# Altium PCB Bracelet_Main.PcbDoc (part 1 of 3)
Units mil, origin at the board's own origin, x right, y up, seen from the top; angles counter-clockwise.
Board outline 865.94 x 2303.17 mil, 4 copper layers (Top Layer, POWER, GND, Bottom Layer), stack 7.834 mil thick; 115 components, 70 nets, 405 pads, 108 vias.
Unrouted connection lines stored in the file: 2.
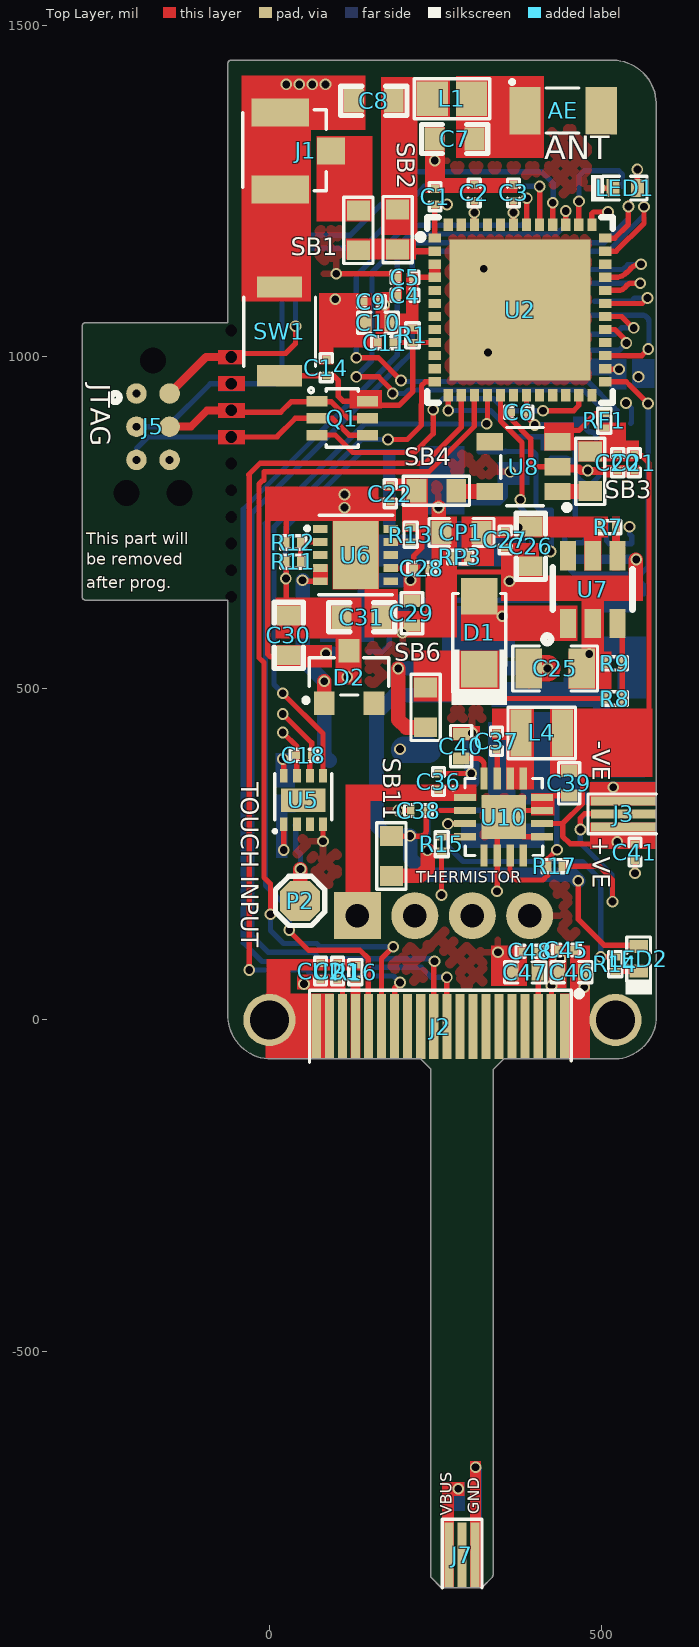
[diagram p0: Top Layer view]
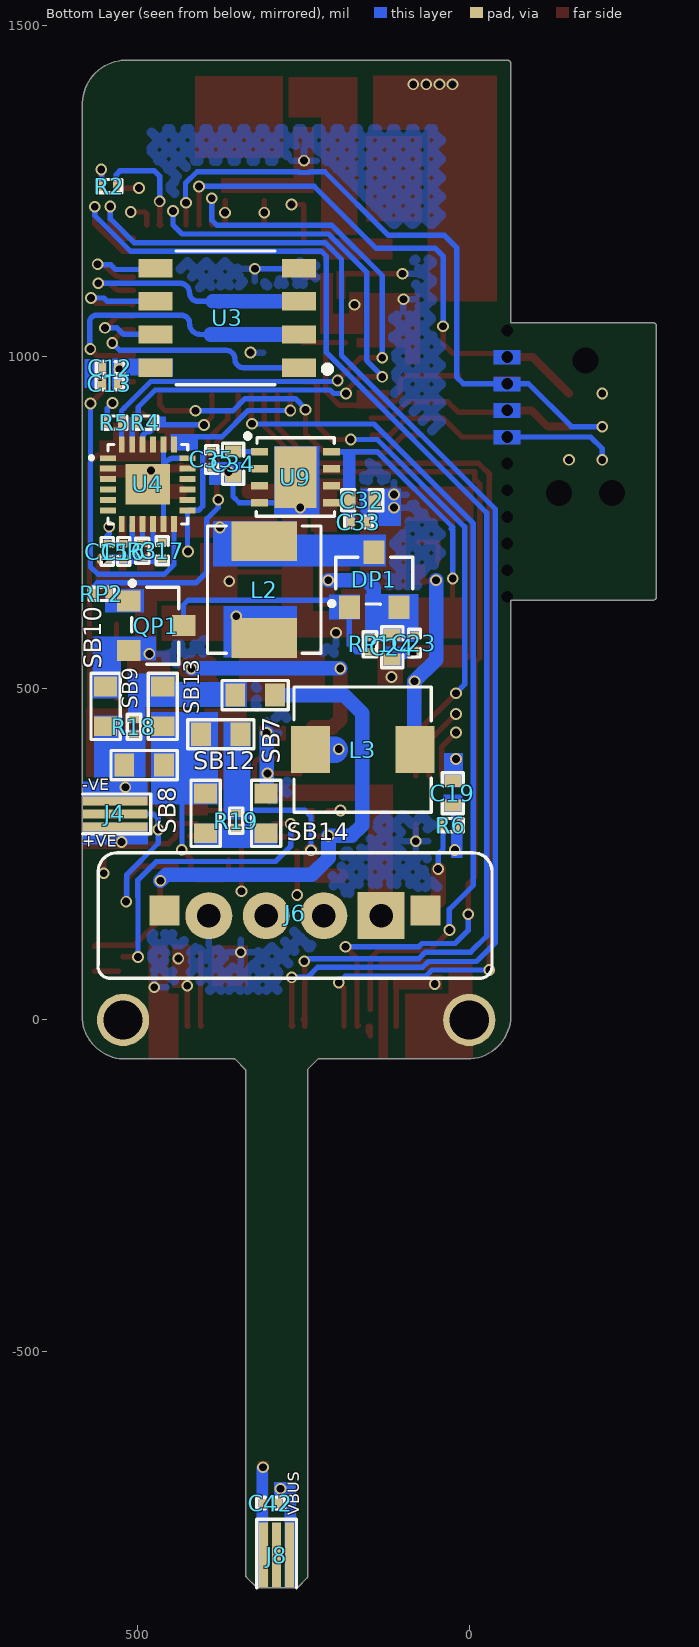
[diagram p1: Bottom Layer view, seen from below]
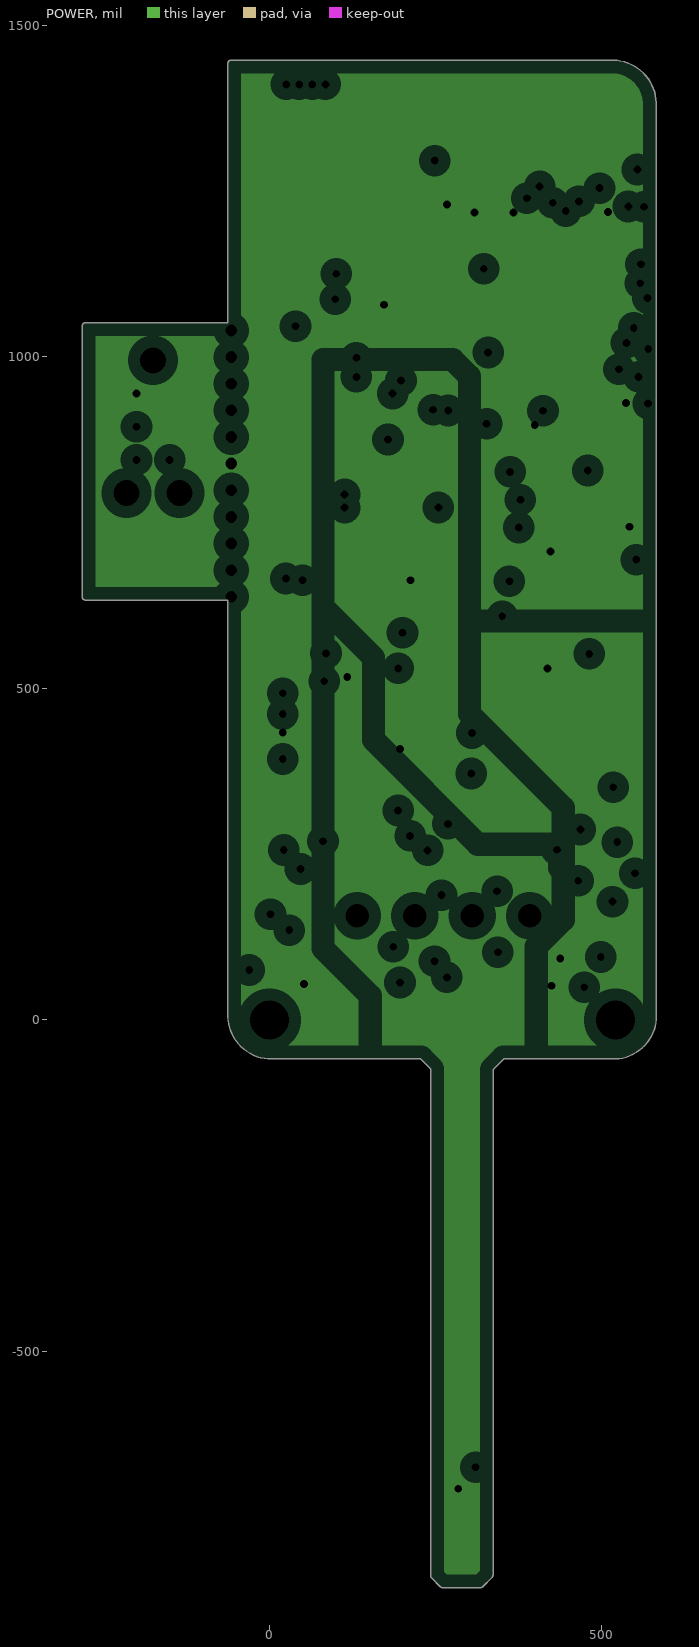
[diagram p2: POWER, clearances drawn from the general rule]
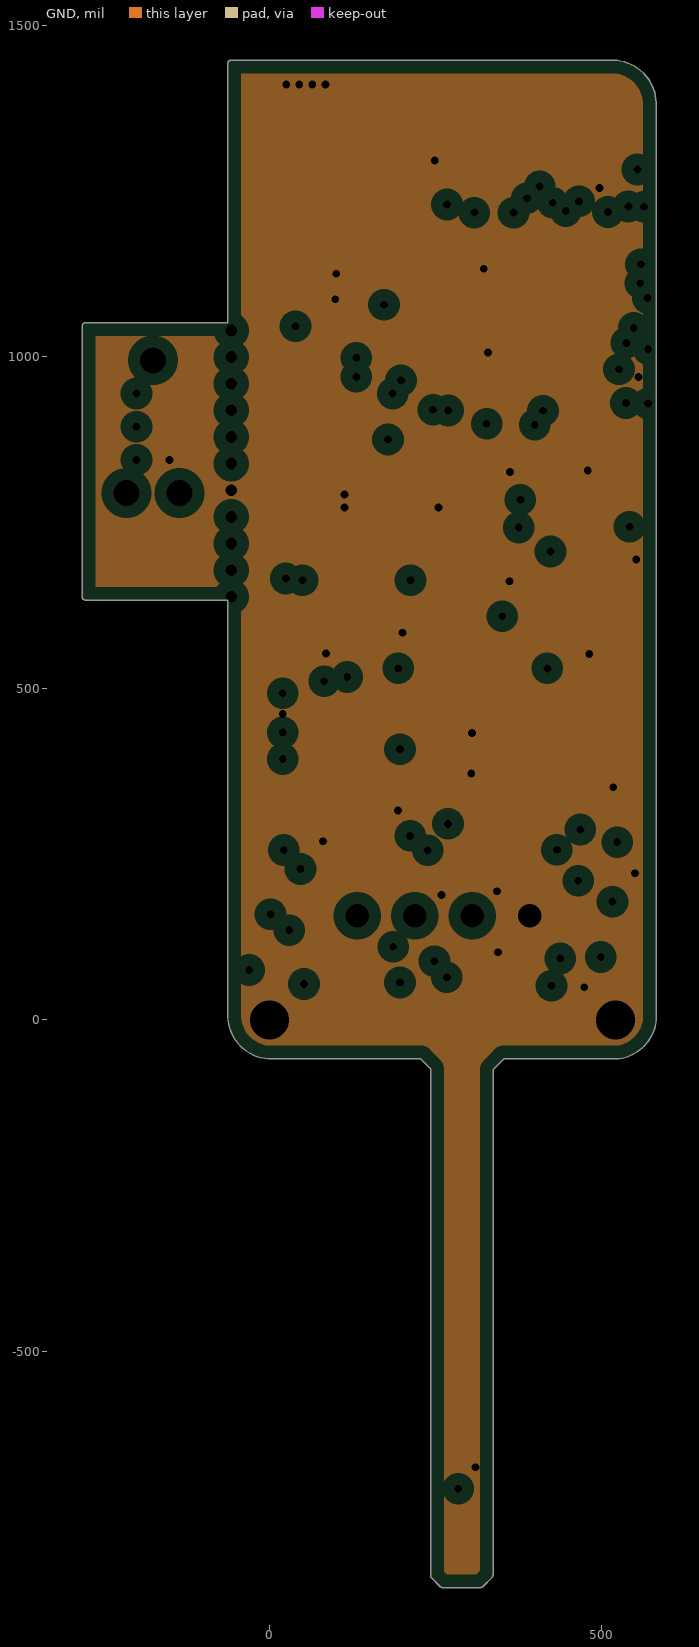
[diagram p3: GND, clearances drawn from the general rule]
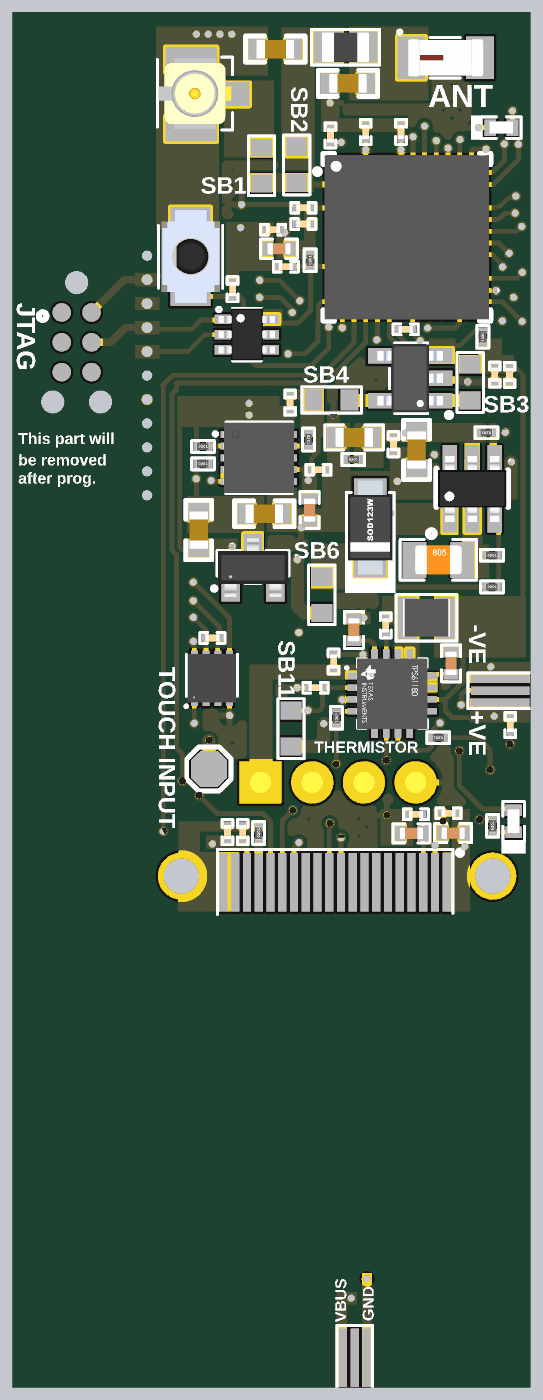
[diagram p5: 3D render of the assembled board from above, using the file's embedded part models]
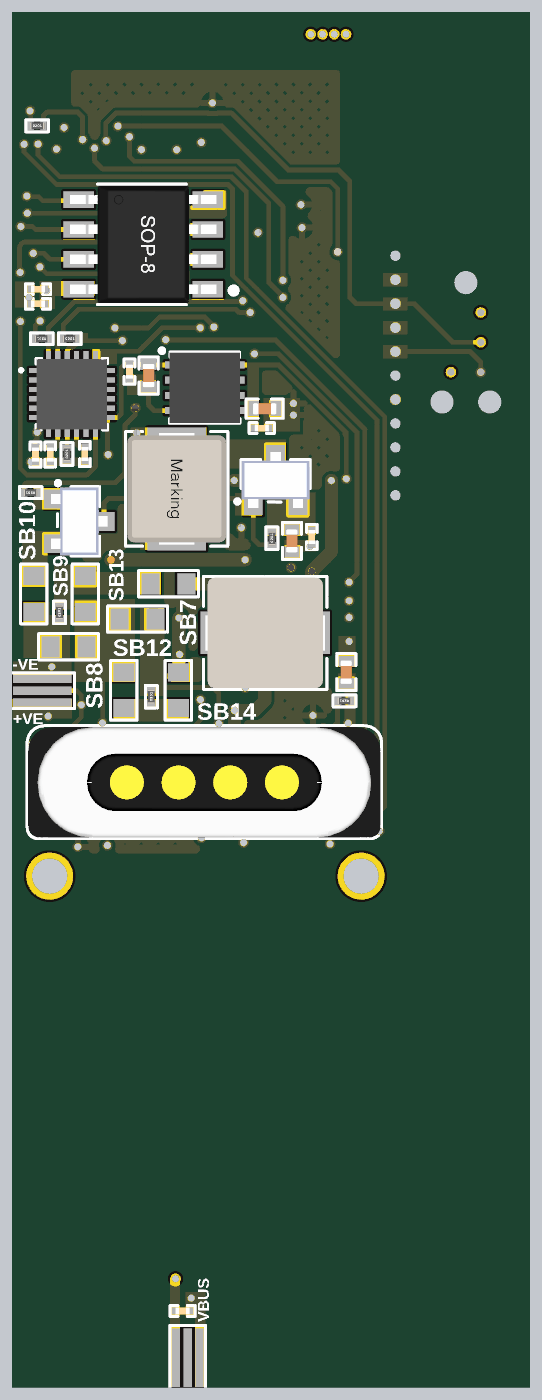
[diagram p6: 3D render of the assembled board from below, using the file's embedded part models]

## Layer stack, top to bottom
Fllex1 Top Coverlay 1: solder mask 1.968, Polyimide, Dk 3.5
Top Layer: signal copper 2.165
Dielectric 1: core 0.591, Polyimide, Dk 4.2
POWER: plane copper 0.669, net (Multiple Nets)
Dielectric 2: prepreg 0.984, Dk 4.2
GND: plane copper 0.669, net GND
Dielectric 3: core 0.591, Polyimide, Dk 4.2
Bottom Layer: signal copper 2.165
Fllex1 Bottom Coverlay 1: solder mask 1.968, Polyimide, Dk 3.5

## Board outline
-282.34,1046.3 cw(c-277.32,1046.3) -277.32,1051.31 -62.65,1051.31 -62.65,1442.14 cw(c-57.63,1442.14) -57.63,1447.15 522.25,1447.15 cw(c522.25,1442.14) 524.23,1446.75 cw(c517.01,1380.88) 583.25,1382.61 cw(c578.25,1382.18) 583.27,1382.18 583.27,3.45 cw(c578.6,1.62) 583.59,1.19 cw(c517.58,6.85) 527.36,-58.68 cw(c526.48,-53.74) 526.48,-58.76 353.47,-58.76 cw(c349.74,-55.4) 353.29,-58.95 337.17,-75.06 337.17,-836.98 cw(c332.16,-836.98) 335.69,-840.55 335.7,-840.53 321.69,-854.54 321.71,-854.53 cw(c318.14,-851) 318.14,-856.01 261.17,-856.01 cw(c261.17,-851) 257.61,-854.53 257.63,-854.54 244.61,-841.53 244.63,-841.55 cw(c248.16,-837.98) 243.14,-837.98 243.14,-74.06 228.03,-58.95 cw(c231.57,-55.4) 227.85,-58.76 -0.92,-58.76 cw(c-1.88,-53.83) -1.88,-58.85 cw(c-1.88,-53.83) -2.3,-58.83 cw(c3.36,7.19) -62.87,5.22 cw(c-57.86,5.37) -62.65,6.86 -62.65,633.02 -277.32,633.02 cw(c-277.32,638.03) -282.34,638.03

## Design rules (kind name [scope] priority, off if disabled: settings)
Clearance [All] p1: gap=5 ignorepadtopadclearanceinfootprint=FALSE except(0: Arc-Hole Track-Hole SMDPad-Hole THPad-Hole Via-Hole Fill-Hole Poly-Hole Region-Hole Text-Hole; 3: Arc-SMDPad Track-SMDPad SMDPad-SMDPad)
HoleToHoleClearance [All] p1: gap=0 allowstackedmicrovias=TRUE
MinimumSolderMaskSliver [All] p1: minsoldermaskwidth=0
PlaneClearance [All] p1: clearance=18
PlaneConnect [All] p1: planeconnectstyle=Direct reliefexpansion=20 reliefentries=4 reliefconductorwidth=10 reliefairgap=10
PolygonConnect [All] p1: thpad.connectstyle=Relief thpad.reliefconductorwidth=10 thpad.reliefentries=4 thpad.polygonreliefangle="90 Angle" thpad.airgapwidth=10 smdpad.connectstyle=Direct smdpad.reliefconductorwidth=10 smdpad.reliefentries=4 smdpad.polygonreliefangle="90 Angle" smdpad.airgapwidth=10 via.connectstyle=Relief via.reliefconductorwidth=10 via.reliefentries=4 via.polygonreliefangle="90 Angle" via.airgapwidth=10
RoutingVias [All] p1: holewidth=11.81 width=17.72 viastyle="Through Hole" minholewidth=11.81 minwidth=17.72 maxholewidth=11.81 maxwidth=17.72
SilkToSilkClearance [All] p1: silktosilkclearance=0
SilkToSolderMaskClearance [IsPad] p1: minsilkscreentomaskgap=0 clearancetoexposedcopper=TRUE
SolderMaskExpansion [All] p1: expansion=4
Width [All] p1: maxlimit=40 minlimit=8 preferedwidth=22
24 further rules are at their usual default settings.

## Classes and differential pairs
component class U_Peripheral_Section: C15 C16 C17 C18 C19 P2 R3 R4 R5 R6 U4 U5
component class U_MCU_Power_Sec: C32 C33 C34 C35 U9
component class U_LED_Power_Sec: C20 C21 C22 C23 C24 C25 C26 C27 CP1 D1 DP1 L2 R7 R8 R9 RF1 RP1 RP2 RP3 SB3 SB4 SB6 U7 U8
component class U_Fast_Charger_Sec: C28 C29 C30 C31 D2 L3 R11 R12 R13 U6
component class U_Controller_Section: AE C1 C2 C3 C4 C5 C6 C7 C8 C9 C10 C11 C12 C13 C14 J1 L1 LED1 Q1 R1 R2 SB1 SB2 SW1 U3
component class U_Connector_Section: C41 C42 C45 C46 C47 C48 CU1 CU2 J2 J3 J4 J5 J7 J8 R16
component class U_Battery_Charging_Section: C36 C37 C38 C39 C40 J6 L4 LED2 R14 R15 R17 R18 R19 SB7 SB8 SB9 SB10 SB11 SB12 SB13 SB14 U10

## Components (designator, comment, footprint, x,y, rotation, side; value= is the part's Value field where it differs from the comment)
AE "2450AT18A100E" 2450AT18A100E 442.91,1371.26 r0 top
C1 "0.1uF" "CAP 0201" 249.76,1241.26 r90 top
C2 "0.1uF" "CAP 0201" 308.76,1247.07 r90 top
C3 "0.1uF" "CAP 0201" 368.06,1247.07 r90 top
C4 "0.1uF" "CAP 0201" 204.47,1092.56 r180 top
C5 "0.1uF" "CAP 0201" 204.47,1119.77 r180 top
C6 "0.1uF" "CAP 0201" 375.94,916.19 r180 top
C7 "2pF" Cap0603 279.13,1328.35 r180 top
C8 "2.7pF" Cap0603 157.48,1385.83 r180 top
C9 "0.1uF" "CAP 0201" 153.76,1083.26 r180 top
C10 "10uF" "Cap 0402" 163.76,1051.26 r180 top
C11 "1uF" "CAP 0201" 174.95,1021.26 r180 top
C12 "1uF" "CAP 0201" 541.57,983.56 r0 bottom
C13 "0.1uF" "CAP 0201" 541.73,959.06 r0 bottom
C14 "0.1uF" "CAP 0201" 85.83,983.46 r90 top
C15 "0.1uF" "CAP 0201" 545.67,706.3 r270 bottom
C16 "0.1uF" "CAP 0201" 520.87,706.3 r270 bottom
C17 "0.1uF" "CAP 0201" 462.99,707.48 r90 bottom
C18 "0.1uF" "CAP 0201" 51.97,399.21 r0 top
C19 "10nF" "Cap 0402" 24.8,341.73 r90 bottom
C20 "1uF" "CAP 0201" 525.25,840.25 r270 top
C21 "0.1uF" "CAP 0201" 550.01,840.06 r270 top
C22 "0.1uF" "CAP 0201" 182.28,793.31 r270 top
C23 "0.1uF" "CAP 0201" 82.68,568.11 r270 bottom
C24 "10uF" "Cap 0402" 115.9,561.81 r270 bottom
C25 "22uF" Cap0805 430.71,529.92 r0 top
C26 "22uF" Cap0603 394.09,714.09 r270 top
C27 "0.1uF" "CAP 0201" 355.46,723.73 r270 top
C28 "1uF" "CAP 0201" 229.56,680.91 r0 top
C29 "10uF" "Cap 0402" 214.96,613.31 r270 top
C30 "22uF" Cap0603 29.13,579.92 r270 top
C31 "22uF" Cap0603 138.96,607.2 r0 top
C32 "4.7uF" "Cap 0402" 161.6,783.25 r180 bottom locked
C33 "0.1uF" "CAP 0201" 166.54,750.79 r180 bottom
C34 "4.7uF" "Cap 0402" 356.1,838.75 r270 bottom locked
C35 "0.1uF" "CAP 0201" 388.19,845.28 r270 bottom
C36 "2.2uF" "CAP 0201" 255.07,359.43 r90 top
C37 "47nF" "CAP 0201" 342.42,420.32 r270 top
C38 "2.2uF" "CAP 0201" 224.8,315.75 r180 top
C39 "10uF" "Cap 0402" 451.97,356.69 r270 top
C40 "10uF" "Cap 0402" 289.07,412.83 r270 top
C41 "0.1uF" "CAP 0201" 551.18,253.15 r270 top
C42 "0.1uF" "CAP 0201" 299.16,-728.57 r0 bottom
C45 "0.1uF" "CAP 0201" 447.64,105.51 r0 top
C46 "4.7uF" "Cap 0402" 455.51,72.05 r0 top
C47 "4.7uF" "Cap 0402" 385.43,71.65 r180 top
C48 "0.1uF" "CAP 0201" 392.91,103.54 r180 top
CP1 "10uF" Cap0603 289.54,735.04 r0 top
CU1 "0.1uF" "CAP 0201" 102.76,73.62 r90 top
CU2 "1uF" "CAP 0201" 77.17,73.62 r90 top
D1 "PMEG3010ER,115" SOD123W 316.54,583.86 r270 top
D2 "PMEG2010ET,215" PMEG2010ET,215 120.08,516.93 r0 top
DP1 "SSM3J334R,LF" SOT-23F 143.31,663.78 r180 bottom
J1 "U.FL-R-SMT-1(80)" U.FL-R-SMT-1(80) 56.69,1310.24 r90 top
J2 "20 Pin FPC" "20 Pin FPC" 257.68,-10.02 r180 top
J3 "3 Pin FPC" "3 Pin FPC" 534.25,310.63 r90 top
J4 "3 Pin FPC" "3 Pin FPC" 534.25,310.63 r270 bottom
J5 "TC2030-IDC" TC2030-IDC -175.51,894.5 r270 top
J6 "HTP-CON-M411H" HTP-CON-M411H 262.6,161.02 r0 bottom locked value=Custom
J7 "3 Pin FPC" "3 Pin FPC" 290.55,-807.09 r0 top
J8 "3 Pin FPC" "3 Pin FPC" 290.55,-807.09 r180 bottom
L1 "2.7nH" L-15W2N7SV4E 275.2,1388.98 r180 top
L2 "MS0420-100M" MS0420-100M 309.01,648.82 r270 bottom value=10uH
L3 "4.7uH" AMDLA4530Q-4R7MT 160.74,407.6 r0 bottom
L4 "1uH" "IND  0806" 410.63,432.68 r0 top
LED1 "16-213/GHC-YR1S1/3T" "LED 0402" 536.26,1254.26 r180 top
LED2 "16-213/GHC-YR1S1/3T" "LED 0402" 556.69,92.13 r270 top
P2 "Test Point" "TEST POINT" 46.26,179.53 r270 top
Q1 "UMH3NTN" SOT-363 109.84,907.48 r0 top
QP1 "MMBT3904-TP" SOT-23F 472.05,594.49 r270 bottom
R1 "10K" Res-0201 215.76,1032.17 r90 top
R2 "1.2K" Res-0201 542.94,1257.26 r180 bottom locked
R3 "10K" Res-0201 492.91,707.28 r90 bottom
R4 "10K" Res-0201 488.25,900.5 r180 bottom locked
R5 "10K" Res-0201 535.08,900.5 r0 bottom locked
R6 "10K" Res-0201 27.8,293.7 r0 bottom
R7 "47K" Res-0201 511.22,742.91 r180 top
R8 "1.4M" Res-0201 520.46,484.65 r0 top
R9 "71.5K" Res-0201 520.46,537.73 r0 top
R11 "95.3K" Res-0201 36.14,690.91 r0 top
R12 "13K" Res-0201 36.14,719.91 r0 top
R13 "1M" Res-0201 212.96,731.73 r270 top
R14 "1K" Res-0201 521.65,84.25 r90 top
R15 "13.3K" Res-0201 259.84,265.16 r270 top
R16 "1M" Res-0201 129.53,72.24 r90 top
R17 "10K" Res-0201 430.51,231.89 r180 top
R18 "21K" Res-0201 505.51,441.93 r90 bottom
R19 "4.32K" Res-0201 351.57,300.59 r90 bottom
RF1 "47K" Res-0201 505.12,903.54 r270 top
RP1 "10K" Res-0201 149.61,566.11 r90 bottom
RP2 "10K" Res-0201 553.74,642.52 r0 bottom
RP3 "10K" Res-0201 287.89,698.03 r0 top
SB1 "Solder Bridge" "Solder Bridge" 134.25,1190.55 r90 top
SB2 "Solder Bridge" "Solder Bridge" 193.31,1191.73 r90 top
SB3 "Solder Bridge" "Solder Bridge" 483.86,827.24 r270 top
SB4 "Solder Bridge" "Solder Bridge" 251.76,797.95 r180 top
SB6 "Solder Bridge" "Solder Bridge" 235.43,471.26 r270 top
SB7 "Solder Bridge" "Solder Bridge" 322.83,489.76 r0 bottom
SB8 "Solder Bridge" "Solder Bridge" 490.2,384.25 r180 bottom
SB9 "Solder Bridge" "Solder Bridge" 462.2,472.83 r90 bottom
SB10 "Solder Bridge" "Solder Bridge" 548.43,472.83 r90 bottom
SB11 "Solder Bridge" "Solder Bridge" 183.86,247.24 r270 top
SB12 "Solder Bridge" "Solder Bridge" 397.64,311.42 r90 bottom
SB13 "Solder Bridge" "Solder Bridge" 374.59,430.71 r180 bottom
SB14 "Solder Bridge" "Solder Bridge" 306.3,311.42 r90 bottom
SW1 "B3U-1000P" B3U-1000P 15.35,1038.19 r90 top
U2 "ESP32-PICO-D4" "48-SMD Module" 377.9,1070.56 r0 top
U3 "LY68L6400SLIT" SOP-8 364.99,1058.56 r0 bottom value=Custom
U4 "ICM-20649" "24-QFN (3x3)" 484.63,807.67 r180 bottom locked
U5 "AT42QT1011-MAHR" 8-UDFN 51.18,331.59 r90 top
U6 "SY7304DBC" DFN-10 129.96,700.91 r0 top
U7 "AX5523CA" SOT-23-6 487.4,648.82 r90 top
U8 "MIC2004-0.5YM5-TR" SOT-23-5 383.43,834.25 r180 top
U9 "AP7361C-33FGE-7" U-DFN3030-8 262.1,818.25 r180 bottom locked
U10 "BQ25303JRTER" "16-WQFN (3x3)" 353.15,305.91 r0 top

## Footprints (in the part's own frame and the unit in brackets; to place one, negate y for a bottom-side part, rotate by r counter-clockwise, add the part's x,y. Pads: shape width x height; smd on the part's side, far side on the other; paste and mask are expansions set on the pad)
"3 Pin FPC" [mm]
  rect 0.35x2.5 smd: 1(-0.5,0) 2(0,0) 3(0.5,0)
  silkscreen extent -0.76,-1.24 0.76,1.37
8-UDFN [mm]
  rect 0.505x0.3 smd: 1(-0.928,0.75) 2(-0.928,0.25) 3(-0.928,-0.25) 4(-0.928,-0.75) 5(0.928,-0.75) 6(0.928,-0.25) 7(0.928,0.25) 8(0.928,0.75)
  rect 0.9x1.7 smd: 9(0,0)
  silkscreen extent -1.21,-1.09 1.01,1.11, body extent -1.03,-1.03 1.03,1.03, height 0.61
"16-WQFN (3x3)" [mm] "Charger IC Lithium Ion/Polymer 16-WQFN (3x3)"
  rect 0.85x0.28 smd: 1(-1.475,0.75) 2(-1.475,0.25) 3(-1.475,-0.25) 4(-1.475,-0.75) 9(1.475,-0.75) 10(1.475,-0.25) 11(1.475,0.25) 12(1.475,0.75)
  rect 0.28x0.85 smd: 5(-0.75,-1.475) 6(-0.25,-1.475) 7(0.25,-1.475) 8(0.75,-1.475) 13(0.75,1.475) 14(0.25,1.475) 15(-0.25,1.475) 16(-0.75,1.475)
  rect 1.7x1.7 smd: 17(0,0)
  silkscreen extent -1.98,-1.48 1.5,1.48, body extent -1.51,-1.51 1.51,1.51, height 0.8
"20 Pin FPC" [mm]
  rect 0.35x2.5 smd: 1(-4.75,0) 2(-4.25,0) 3(-3.75,0) 4(-3.25,0) 5(-2.75,0) 6(-2.25,0) 7(-1.75,0) 8(-1.25,0) 9(-0.75,0) 10(-0.25,0) 11(0.25,0) 12(0.75,0) 13(1.25,0) 14(1.75,0) 15(2.25,0) 16(2.75,0) 17(3.25,0) 18(3.75,0) 19(4.25,0) 20(4.75,0)
  silkscreen extent -5.01,-1.4 5.01,1.37
"24-QFN (3x3)" [mm]
  rect 0.62x0.22 smd: 1(-1.52,1) 2(-1.52,0.6) 3(-1.52,0.2) 4(-1.52,-0.2) 5(-1.52,-0.6) 6(-1.52,-1) 13(1.52,-1) 14(1.52,-0.6) 15(1.52,-0.2) 16(1.52,0.2) 17(1.52,0.6) 18(1.52,1)
  rect 0.22x0.62 smd: 7(-1,-1.52) 8(-0.6,-1.52) 9(-0.2,-1.52) 10(0.2,-1.52) 11(0.6,-1.52) 12(1,-1.52) 19(1,1.52) 20(0.6,1.52) 21(0.2,1.52) 22(-0.2,1.52) 23(-0.6,1.52) 24(-1,1.52)
  rect 1.7x1.54 smd: 25(0,0)
  silkscreen extent -2.23,-1.52 1.52,1.52, body extent -1.5,-1.5 1.5,1.5, height 1.03
"48-SMD Module" [mm]
  rect 0.47x0.35 smd: 1(-3.265,2.75) 2(-3.265,2.25) 3(-3.265,1.75) 4(-3.265,1.25) 5(-3.265,0.75) 6(-3.265,0.25) 7(-3.265,-0.25) 8(-3.265,-0.75) 9(-3.265,-1.25) 10(-3.265,-1.75) 11(-3.265,-2.25) 12(-3.265,-2.75) 25(3.265,-2.75) 26(3.265,-2.25) 27(3.265,-1.75) 28(3.265,-1.25) 29(3.265,-0.75) 30(3.265,-0.25) 31(3.265,0.25) 32(3.265,0.75) 33(3.265,1.25) 34(3.265,1.75) 35(3.265,2.25) 36(3.265,2.75)
  rect 0.35x0.47 smd: 13(-2.75,-3.265) 14(-2.25,-3.265) 15(-1.75,-3.265) 16(-1.25,-3.265) 17(-0.75,-3.265) 18(-0.25,-3.265) 19(0.25,-3.265) 20(0.75,-3.265) 21(1.25,-3.265) 22(1.75,-3.265) 23(2.25,-3.265) 24(2.75,-3.265) 37(2.75,3.265) 38(2.25,3.265) 39(1.75,3.265) 40(1.25,3.265) 41(0.75,3.265) 42(0.25,3.265) 43(-0.25,3.265) 44(-0.75,3.265) 45(-1.25,3.265) 46(-1.75,3.265) 47(-2.25,3.265) 48(-2.75,3.265)
  rect 5.4x5.4 smd paste-4: 49(0,0)
  silkscreen extent -3.91,-3.55 3.55,3.55, body extent -3.5,-3.5 3.5,3.5, height 1.04
2450AT18A100E [mm] "RF ANT 2.4GHZ CHIP SOLDER SMD"
  rect 1.2x1.82 smd: 1(-1.46,0) 2(1.46,0)
  silkscreen extent -2.01,-0.86 0.61,1.14, body extent -1.6,-0.8 1.6,0.8, height 1.3
AMDLA4530Q-4R7MT [mm]
  rect 1.5x1.8 smd: 1(-2,0) 2(2,0)
  silkscreen extent -2.63,-2.4 2.63,2.4, body extent -2.55,-2.35 2.55,2.35, height 2.92
B3U-1000P [mm] "SWITCH TACTILE SPST-NO 0.05A 12V"
  rect 0.82x1.72 smd: 1(-1.7,0) 2(1.7,0)
  silkscreen extent -1.35,-1.37 1.32,1.37, body extent -2,-1.26 2,1.24, height 1.6
Cap0603 [mil]
  rect 30x35 smd mask+2.36: 1(-30,0) 2(30,0)
  silkscreen extent -50,-22 50,22, body extent -32,-16 31,16, height 34
Cap0805 [mil] "SMD 0805"
  rect 40x60 smd mask+2.76: 1(-40,0) 2(40,0)
  silkscreen extent -64,-34 64,34, body extent -39,-25 39,25, height 30
"CAP 0201" [mm]
  rect 0.3x0.3 smd mask+0.055: 1(-0.3,0) 2(0.3,0)
  silkscreen extent -0.53,-0.23 0.53,0.23, body extent -0.3,-0.15 0.3,0.15, height 0.28
"Cap 0402" [mil]
  rect 18x25 smd mask+2.36: 1(-18.5,0) 2(18.5,0)
  silkscreen extent -31,-16 31,16, body extent -20,-10 20,10, height 19
DFN-10 [mm] "33V 4A DFN-10 DC-DC Converters RoHS"
  rect 0.55x0.3 smd: 1(-1.35,1) 2(-1.35,0.5) 3(-1.35,0) 4(-1.35,-0.5) 5(-1.35,-1) 6(1.35,-1) 7(1.35,-0.5) 8(1.35,0) 9(1.35,0.5) 10(1.35,1)
  rect 1.75x2.6 smd: 11(0,0)
  silkscreen extent -1.88,-1.52 1.42,1.52, body extent -1.5,-1.5 1.5,1.5, height 0.8
HTP-CON-M411H [mm]
  rect 1.8x1.8 hole 0.9: 1(-3.3,0.1)
  round 1.8 hole 0.9: 2(-1.1,0.1) 3(1.1,0.1) 4(3.3,0.1)
  rect 1.15x1.15 smd: MP1(-5,-0.1) MP2(5,-0.1)
  silkscreen extent -7.55,-2.31 7.55,2.49, body extent -7.5,-2.25 7.5,2.45, height 6.74
"IND  0806" [mm] "1uH ±20% 3.6A 0806 Inductors (SMD) RoHS"
  rect 0.8x1.8 smd: 1(-0.8,0) 2(0.8,0)
  silkscreen extent -1.3,-0.99 1.3,0.99, body extent -1,-0.8 1,0.8, height 1
L-15W2N7SV4E [mm] "FIXED IND 2.7NH 800MA 80MOHM SMD"
  rect 1.2x1.32 smd: 1(-0.75,0) 2(0.75,0)
  silkscreen extent -1.45,-0.76 1.45,0.76, body extent -1,-0.62 1,0.63, height 0.47
"LED 0402" [mm] "Green 520~535nm 0402 Light Emitting Diodes (LED) RoHS"
  rect 0.5x0.7 smd: 1(-0.47,0) 2(0.47,0)
  silkscreen extent -0.84,-0.51 1.3,0.51, body extent -0.5,-0.25 0.5,0.25, height 0.5
MS0420-100M [mm]
  rect 1.52x2.5 smd: 1(-1.85,0) 2(1.85,0)
  silkscreen extent -2.44,-2.17 2.44,2.17, body extent -2.37,-2.1 2.38,2.1, height 1.98
PMEG2010ET,215 [mm]
  rect 0.8x0.9 smd: 1(-0.95,-1) 2(0.95,-1) 3(0,1)
  silkscreen extent -1.7,-0.94 1.52,0.74, body extent -1.5,-1.25 1.5,1.25, height 1.09
Res-0201 [mm]
  rect 0.27x0.37 smd: 1(-0.275,0) 2(0.275,0)
  silkscreen extent -0.48,-0.25 0.48,0.25, body extent -0.3,-0.15 0.3,0.15, height 0.29
SOD123W [mm] "DIODE SCHOTTKY 30V 1A SOD123W"
  rect 1.4x1.4 smd: A(-1.4,0) K(1.4,0)
  silkscreen extent -1.5,-1.07 2.77,1.07, body extent -2,-0.95 2,0.95, height 1.1
"Solder Bridge" [mil] "Solder Bridge ON"
  rect 30x35 smd: 1(-30,0) 2(30,0)
  silkscreen extent -50,-22 50,22
SOP-8 [mm]
  rect 1.3x0.7 smd: 1(-2.75,1.905) 2(-2.75,0.635) 3(-2.75,-0.635) 4(-2.75,-1.905) 5(2.75,-1.905) 6(2.75,-0.635) 7(2.75,0.635) 8(2.75,1.905)
  silkscreen extent -3.97,-2.57 1.96,2.57, body extent -3.11,-2.5 3.11,2.5, height 1.87
SOT-23-5 [mm]
  rect 1x0.66 smd: 1(-1.3,0.95) 2(-1.3,0) 3(-1.3,-0.95) 4(1.3,-0.95) 5(1.3,0.95)
  silkscreen extent -1.74,-1.5 0.88,1.65, body extent -1.4,-1.45 1.4,1.45, height 1.45
SOT-23-6 [mm] "IC BAT CHG LI-ION 1 CELL SOT23-6"
  rect 1.12x0.62 smd: 1(-1.3,0.95) 2(-1.3,0) 3(-1.3,-0.95) 4(1.3,-0.95) 5(1.3,0) 6(1.3,0.95)
  silkscreen extent -2.04,-1.52 0.86,1.88, body extent -1.4,-1.45 1.4,1.45, height 1.44
SOT-23F [mm]
  rect 0.8x0.9 smd: 1(-0.95,-1.05) 2(0.95,-1.05) 3(0,1.05)
  silkscreen extent -1.68,-0.97 1.47,0.86, body extent -1.45,-1.2 1.45,1.2, height 0.89
SOT-363 [mm] "Dual Digital Transistors"
  rect 0.8x0.4 smd: 1(-0.97,0.65) 2(-0.97,0) 3(-0.97,-0.65) 4(0.97,-0.65) 5(0.97,0) 6(0.97,0.65)
  silkscreen extent -1.29,-1.12 0.61,1.16, body extent -1.2,-1.1 1.2,1.1, height 1.08
TC2030-IDC [mil] "CABLE ADAPTER 6 POS"
  round 30.98 smd: 1(-50,-25) 1(-50,-25) 2(-50,25) 3(0,-25) 4(0,25) 5(50,-25) 6(50,25)
  round 0 hole 39.02 unplated mask+4.02: MP5(-100,0) MP6(100,-40) MP7(100,40)
  silkscreen extent -50,-63 -38,-51
"TEST POINT" [mil]
  oct 60x60 smd: 1(0,0)
  silkscreen extent -37,-37 37,37
U-DFN3030-8 [mm] "Fixed 6V 3.3V 360mV @ 1A UDFN-8 Dropout Regulators(LDO) RoHS"
  rect 0.65x0.3 smd: 1(-1.375,0.975) 2(-1.375,0.325) 3(-1.375,-0.325) 4(-1.375,-0.975) 5(1.375,-0.975) 6(1.375,-0.325) 7(1.375,0.325) 8(1.375,0.975)
  rect 1.6x2.35 smd: 9(0,0)
  silkscreen extent -1.88,-1.5 1.5,1.64, body extent -1.5,-1.5 1.5,1.5, height 0.59
U.FL-R-SMT-1(80) [mm]
  rect 1.02x1.07 smd: 1(0,-0.923)
  rect 1.07x2.2 smd: 2(1.475,1.025) 3(-1.475,1.025)
  silkscreen extent -1.52,-0.74 1.57,2.46, body extent -1.47,-0.69 1.53,2.41, height 1.2

## Part data
AE: "2.4GHz Chip RF Antenna 2.4GHz ~ 2.5GHz 0.5dBi Solder Surface Mount", Package="FBGA-780 Johanson", Availability=Unavailable, MF="Johanson Technology", MP=2450AT18A100E, Price=None, SnapEDA_Link=https://www.snapeda.com/parts/2450AT18A100E/Johanson%20Technology%20Inc./view-part/267154/?ref=snap
C1 C2 C3 C4 C5 C6 C9 C13 C14 C15 C16 C17 C18 C21 C22 C23 C27 C41 C42 C45 C48 CU1: library part GRM033R61E104KE14D, "Multilayer Ceramic Capacitors MLCC - SMD/SMT 0201 0.1uF 25volts X5R 10%", Capacitance=100nF, Case Code (Imperial)=0201, Case Code (Metric)=0603, Dielectric=X5R, Manufacturer=Murata, Max Operating Temperature=85°C, Min Operating Temperature=-55°C, Package Quantity=15000, Resistor Type=Ceramic, Supplier Part Number 1=81-GRM033R61E104KE4D, Tolerance=10%, Voltage Rating=25V, Case/Package=0201, Category="Ceramic Capacitors", ComponentLink1Description=http://www.farnell.com/datasheets/2867843.pdf?src-supplier=Farnell, ComponentLink1URL=http://www.farnell.com/datasheets/2867843.pdf?src-supplier=Farnell, ComponentLink2Description=http://www.mouser.com/ds/2/281/c02e-2905.pdf?src-supplier=Mouser, ComponentLink2URL=http://www.mouser.com/ds/2/281/c02e-2905.pdf?src-supplier=Mouser, ComponentLink3Description=http://search.murata.co.jp/Ceramy/image/img/A01X/G101/ENG/GRM033R61E104KE14-01.pdf?src-supplier=Digi-Key, ComponentLink3URL=http://search.murata.co.jp/Ceramy/image/img/A01X/G101/ENG/GRM033R61E104KE14-01.pdf?src-supplier=Digi-Key, ComponentLink4Description=http://www.farnell.com/datasheets/2867843.pdf?src-supplier=Newark, ComponentLink4URL=http://www.farnell.com/datasheets/2867843.pdf?src-supplier=Newark, Height=0.3mm, Lead Free="Lead Free", Length=0.024inch, Manufacturer Part Number=GRM033R61E104KE14D, Mount="Surface Mount", Packaging="Tape and Reel", Pricing 1="1=0.10000, 10=0.03100, 50=0.03100, 100=0.02500, 1000=0.01700, 10000=0.01400 (USD)", RoHS=Yes, RoHS Compliant=Yes, Stock 1=22478, Supplier 1=Mouser, Termination=SMD/SMT, Thickness=0.013inch, Voltage Rating (DC)=25V, Weight=1.2E-05oz, Width=0.012inch
C7: library part CML0603C0G2R0CT50V, "CAP CER 2PF 50V C0G/NP0 0603", Manufacturer="Stackpole Electronics", Supplier Part Number 1=738-CML0603C0G2R0CT50VCT-ND, ComponentLink1Description=http://datasheet.octopart.com/CML0603C0G2R0CT50V-Stackpole-Electronics-datasheet-141158289.pdf?src-supplier=Stackpole+Electronics, ComponentLink1URL=http://datasheet.octopart.com/CML0603C0G2R0CT50V-Stackpole-Electronics-datasheet-141158289.pdf?src-supplier=Stackpole+Electronics, Manufacturer Part Number=CML0603C0G2R0CT50V, Pricing 1="1=0.1, 10=0.061, 50=0.0332, 100=0.027, 500=0.0193, 1000=0.0152 (USD)", Stock 1=6378, Supplier 1=Digi-Key
C8: library part CML0603C0G2R7CT50V, "CAP CER 2.7PF 50V C0G/NP0 0603", Manufacturer="Stackpole Electronics", Supplier Part Number 1=738-CML0603C0G2R7CT50VCT-ND, ComponentLink1Description=http://datasheet.octopart.com/CML0603C0G2R7CT50V-Stackpole-Electronics-datasheet-141158289.pdf?src-supplier=Stackpole+Electronics, ComponentLink1URL=http://datasheet.octopart.com/CML0603C0G2R7CT50V-Stackpole-Electronics-datasheet-141158289.pdf?src-supplier=Stackpole+Electronics, Manufacturer Part Number=CML0603C0G2R7CT50V, Pricing 1="1=0.1, 10=0.061, 50=0.0332, 100=0.027, 500=0.0193, 1000=0.0152 (USD)", Stock 1=7780, Supplier 1=Digi-Key
C10 C24 C29 C39 C40: library part GRM155R61A106ME44D, "10uF ±20% 10V X5R 0402 Multilayer Ceramic Capacitors MLCC - SMD/SMT RoHS", Manufacturer="Murata Electronics", Package=0402, Temperature Coefficient=X5R, Tolerance=±20%, Voltage - Rated="Voltage - Rated", Capacitance=10uF
C11 C12 C20 C28 CU2: library part CL03A105MO3NRNC, "Mlcc 0201 X5R1UF16V 20% T: 0.39MM", Manufacturer=Samsung, Category="Ceramic Capacitors", Manufacturer Part Number=CL03A105MO3NRNC, Pricing 1="100000=0.02840, 120000=0.02800, 220000=0.02720, 500000=0.02660, 1000000=0.02560, 5000000=0.02500, 10000000=0.02440 (USD)", RoHS=Yes, RoHS Compliant=Yes, Supplier 1=Avnet, Supplier Part Number 1=CL03A105MO3NRNC
C19: library part CC0402KRX7R8BB103, "CAP CER 10000PF 25V X7R 0402", Case Code (Imperial)=0402, Case Code (Metric)=1005, Dielectric=X7R, Manufacturer=Yageo, Max Operating Temperature=125°C, Min Operating Temperature=-55°C, Package Quantity=1, Supplier Part Number 1=311-1337-1-ND, Tolerance=10%, Voltage Rating=25V, Capacitance=10nF, Case/Package=0402, ComponentLink1Description=http://www.yageo.com/documents/recent/UPY-GPHC_X7R_6.3V-to-50V_18.pdf?src-supplier=Digi-Key, ComponentLink1URL=http://www.yageo.com/documents/recent/UPY-GPHC_X7R_6.3V-to-50V_18.pdf?src-supplier=Digi-Key, ComponentLink2Description=https://www.verical.com/server-webapp/html/getDatasheet?partID=375418&src-supplier=Verical, ComponentLink2URL=https://www.verical.com/server-webapp/html/getDatasheet?partID=375418&src-supplier=Verical, ComponentLink3Description=http://www.yageo.com/documents/recent/UPY-GPHC_X7R_6.3V-to-50V_8.pdf?src-supplier=Avnet, ComponentLink3URL=http://www.yageo.com/documents/recent/UPY-GPHC_X7R_6.3V-to-50V_8.pdf?src-supplier=Avnet, ComponentLink4Description=https://4donline.ihs.com/images/VipMasterIC/IC/YAGO/YAGO-S-A0003557223/YAGO-S-A0003557223-1.pdf?hkey=52A5661711E402568146F3353EA87419&src-supplier=Element14, ComponentLink4URL=https://4donline.ihs.com/images/VipMasterIC/IC/YAGO/YAGO-S-A0003557223/YAGO-S-A0003557223-1.pdf?hkey=52A5661711E402568146F3353EA87419&src-supplier=Element14, ComponentLink5Description=http://www.farnell.com/datasheets/2167236.pdf?src-supplier=Element14, ComponentLink5URL=http://www.farnell.com/datasheets/2167236.pdf?src-supplier=Element14, ComponentLink6Description=http://www.mouser.com/ds/2/447/Yageo_UPY-GP_NP0_16V-to-50V_9-358835.pdf?src-supplier=Mouser, ComponentLink6URL=http://www.mouser.com/ds/2/447/Yageo_UPY-GP_NP0_16V-to-50V_9-358835.pdf?src-supplier=Mouser, Composition=Ceramic, Depth=0.5mm, Halogen Free="Halogen Free", Height=0.5mm, Lead Free="Lead Free", Length=1mm, Manufacturer Part Number=CC0402KRX7R8BB103, Mount="Surface Mount", Packaging="Tape and Reel", Pricing 1="1=0.1, 10=0.021, 100=0.0093, 500=0.00666, 1000=0.00523, 2500=0.00476, 5000=0.00438 (USD)", Radiation Hardening=No, REACH SVHC=Unknown, Stock 1=0, Supplier 1=Digi-Key, Termination=SMD/SMT, Thickness=0.022inch, Voltage Rating (DC)=25V, Width=0.02inch
C25: library part CL21A226MOQNNNE, "CAP CER 22UF 16V X5R 0805", Case Code (Imperial)=0805, Case Code (Metric)=2012, Dielectric=X5R, Manufacturer=Samsung, Max Operating Temperature=85°C, Min Operating Temperature=-55°C, Package Quantity=1, Supplier Part Number 1=1276-2909-1-ND, Tolerance=20%, Voltage Rating=16V, Capacitance=22uF, Case/Package=0805, Category="Ceramic Capacitors", ComponentLink1Description=https://datasheet.ciiva.com/25724/cl21a226moqnnne-25724832.pdf?src-supplier=Digi-Key, ComponentLink1URL=https://datasheet.ciiva.com/25724/cl21a226moqnnne-25724832.pdf?src-supplier=Digi-Key, Construction=Flat, Contact Plating=Tin, Lead Free="Lead Free", Length=0.079inch, Manufacturer Part Number=CL21A226MOQNNNE, Mount="Surface Mount", Packaging="Cut Tape", Pricing 1="1=0.30000, 10=0.20900, 50=0.13900, 100=0.11820, 500=0.08344, 1000=0.07301 (USD)", RoHS=Yes, RoHS Compliant=Yes, Series=CL, Stock 1=91301, Supplier 1=Digi-Key, Termination=Wraparound, Thickness=0.055inch, Voltage Rating (DC)=16V, Width=0.049inch
C26 C30 C31: library part GRT188R61A226ME13D, "Cap Ceramic Monolithic 22uF 10VDC 20% SMD Paper T/R", Manufacturer=Murata, Manufacturer Part Number=GRT188R61A226ME13D, Pricing 1="4000=0.10936, 8000=0.10684, 16000=0.10534, 24000=0.10233, 32000=0.10007 (USD)", RoHS=Yes, Supplier 1=Avnet, Supplier Part Number 1=GRT188R61A226ME13D
C32 C34 C46 C47: library part CL05A475MO5NUNC, "Cap Ceramic 4.7uF 16V X5R 20% SMD 0402 85C T/R", Case Code (Imperial)=0402, Case Code (Metric)=1005, Manufacturer=Samsung, Max Operating Temperature=85°C, Min Operating Temperature=-55°C, Supplier Part Number 1=82AC9197, Tolerance=20%, Voltage Rating=16V, Capacitance=4.7uF, Case/Package=0402, Category="Ceramic Capacitors", ComponentLink1Description=http://www.farnell.com/datasheets/2710653.pdf?src-supplier=Farnell, ComponentLink1URL=http://www.farnell.com/datasheets/2710653.pdf?src-supplier=Farnell, ComponentLink2Description=http://www.farnell.com/datasheets/2710653.pdf?src-supplier=Newark, ComponentLink2URL=http://www.farnell.com/datasheets/2710653.pdf?src-supplier=Newark, ComponentLink3Description=http://www.samsungsem.com/kr/support/product-search/mlcc/CL05A475MO5NUNC.jsp?src-supplier=Digi-Key, ComponentLink3URL=http://www.samsungsem.com/kr/support/product-search/mlcc/CL05A475MO5NUNC.jsp?src-supplier=Digi-Key, Length=0.039inch, Manufacturer Part Number=CL05A475MO5NUNC, Mount="Surface Mount", Packaging="Tape and Reel", Pricing 1="1=0.63800, 25=0.44600, 100=0.26800, 250=0.23400, 500=0.20000, 1000=0.16900 (USD)", RoHS=Yes, RoHS Compliant=Yes, Supplier 1=Avnet, Thickness=0.022inch, Width=0.02inch
C33 C35: library part GRM033R61E104KE14D, "CAP CER 0.1UF 25V X5R 0201", Capacitance=100nF, Case Code (Imperial)=0201, Case Code (Metric)=0603, Dielectric=X5R, Manufacturer=Murata, Max Operating Temperature=85°C, Min Operating Temperature=-55°C, Package Quantity=15000, Resistor Type=Ceramic, Supplier Part Number 1=81-GRM033R61E104KE4D, Tolerance=10%, Voltage Rating=25V, Case/Package=0201, Category="Ceramic Capacitors", ComponentLink1Description=http://www.farnell.com/datasheets/2867843.pdf?src-supplier=Farnell, ComponentLink1URL=http://www.farnell.com/datasheets/2867843.pdf?src-supplier=Farnell, ComponentLink2Description=http://www.mouser.com/ds/2/281/c02e-2905.pdf?src-supplier=Mouser, ComponentLink2URL=http://www.mouser.com/ds/2/281/c02e-2905.pdf?src-supplier=Mouser, ComponentLink3Description=http://search.murata.co.jp/Ceramy/image/img/A01X/G101/ENG/GRM033R61E104KE14-01.pdf?src-supplier=Digi-Key, ComponentLink3URL=http://search.murata.co.jp/Ceramy/image/img/A01X/G101/ENG/GRM033R61E104KE14-01.pdf?src-supplier=Digi-Key, ComponentLink4Description=http://www.farnell.com/datasheets/2867843.pdf?src-supplier=Newark, ComponentLink4URL=http://www.farnell.com/datasheets/2867843.pdf?src-supplier=Newark, Height=0.3mm, Lead Free="Lead Free", Length=0.024inch, Manufacturer Part Number=GRM033R61E104KE14D, Mount="Surface Mount", Packaging="Tape and Reel", Pricing 1="1=0.10000, 10=0.03100, 50=0.03100, 100=0.02500, 1000=0.01700, 10000=0.01400 (USD)", RoHS=Yes, RoHS Compliant=Yes, Stock 1=22478, Supplier 1=Mouser, Termination=SMD/SMT, Thickness=0.013inch, Voltage Rating (DC)=25V, Weight=1.2E-05oz, Width=0.012inch
C36 C38: library part GRM033R61A225ME47D, "CAP CER 2.2UF 10V X5R 0201", Case Code (Imperial)=0201, Case Code (Metric)=0603, Dielectric=X5R, Manufacturer=Murata, Max Operating Temperature=85°C, Min Operating Temperature=-55°C, Tolerance=20%, Voltage Rating=10V, Capacitance=2.2uF, Case/Package=0201, Category="Ceramic Capacitors", ComponentLink1Description=http://search.murata.co.jp/Ceramy/image/img/A01X/G101/ENG/GRM033R61A225ME47-01.pdf?src-supplier=Digi-Key, ComponentLink1URL=http://search.murata.co.jp/Ceramy/image/img/A01X/G101/ENG/GRM033R61A225ME47-01.pdf?src-supplier=Digi-Key, ComponentLink2Description=https://www.murata.com/~/media/webrenewal/support/library/catalog/products/capacitor/mlcc/c02e.ashx?la=en-us&src-supplier=Digi-Key, ComponentLink2URL=https://www.murata.com/~/media/webrenewal/support/library/catalog/products/capacitor/mlcc/c02e.ashx?la=en-us&src-supplier=Digi-Key, Length=0.024inch, Manufacturer Part Number=GRM033R61A225ME47D, Mount="Surface Mount", Packaging="Tape and Reel", Pricing 1="15000=0.04772, 30000=0.04483, 60000=0.04193, 90000=0.03904, 120000=0.03615, 150000=0.03495, 1500000=0.03374 (USD)", RoHS=Yes, RoHS Compliant=Yes, Supplier 1=Avnet, Supplier Part Number 1=GRM033R61A225ME47D, Thickness=0.015inch, Voltage Rating (DC)=10V, Width=0.012inch
C37: library part GRM033R61C473KE84D, "CAP SMD .047uF 16V 0201", Case Code (Imperial)=0201, Case Code (Metric)=0603, Dielectric=X5R, Manufacturer=Murata, Max Operating Temperature=85°C, Min Operating Temperature=-55°C, Package Quantity=15000, Supplier Part Number 1=490-7227-1-ND, Tolerance=10%, Voltage Rating=16V, Capacitance=47nF, Case/Package=0201, Category="Ceramic Capacitors", ComponentLink1Description=https://datasheet.ciiva.com/18699/grm033r61c473ke84-01-18699268.pdf?src-supplier=Digi-Key, ComponentLink1URL=https://datasheet.ciiva.com/18699/grm033r61c473ke84-01-18699268.pdf?src-supplier=Digi-Key, ComponentLink2Description=https://datasheet.ciiva.com/18699/partnumbering-e-01-18699269.pdf?src-supplier=Digi-Key, ComponentLink2URL=https://datasheet.ciiva.com/18699/partnumbering-e-01-18699269.pdf?src-supplier=Digi-Key, ComponentLink3Description=https://datasheet.ciiva.com/24221/c02e-24221301.pdf?src-supplier=Mouser, ComponentLink3URL=https://datasheet.ciiva.com/24221/c02e-24221301.pdf?src-supplier=Mouser, ComponentLink4Description=https://datasheet.ciiva.com/18699/partnumbering-e-01-18699270.pdf?src-supplier=Digi-Key, ComponentLink4URL=https://datasheet.ciiva.com/18699/partnumbering-e-01-18699270.pdf?src-supplier=Digi-Key, Height=0.3mm, Lead Free="Lead Free", Length=0.024inch, Manufacturer Part Number=GRM033R61C473KE84D, Mount="Surface Mount", Packaging="Tape and Reel", Pricing 1="1=0.10000, 10=0.06800, 50=0.03720, 100=0.03040, 500=0.02174, 1000=0.01708, 2500=0.01552, 5000=0.01428 (USD)", RoHS=Yes, RoHS Compliant=Yes, Stock 1=292349, Supplier 1=Digi-Key, Termination=SMD/SMT, Thickness=0.013inch, Voltage Rating (DC)=16V, Weight=1.2E-05oz, Width=0.012inch
CP1: library part GRM188R61E106KA73D, "CAP CER 10UF 25V X5R 0603", Case/Package=0603, Manufacturer=Murata, Supplier Part Number 1=81-GRM188R61E106KA3D, Category="Ceramic Capacitors", ComponentLink1Description=https://search.murata.co.jp/Ceramy/image/img/A01X/G101/ENG/GRM188R61E106KA73-01.pdf?src-supplier=Digi-Key, ComponentLink1URL=https://search.murata.co.jp/Ceramy/image/img/A01X/G101/ENG/GRM188R61E106KA73-01.pdf?src-supplier=Digi-Key, Manufacturer Part Number=GRM188R61E106KA73D, Pricing 1="1=0.36000, 10=0.25800, 50=0.25800, 100=0.15500, 1000=0.09800, 10000=0.06900 (USD)", RoHS=Yes, RoHS Compliant=Yes, Stock 1=319428, Supplier 1=Mouser
D1: "DIODE SCHOTTKY 30V 1A SOD123W", Manufacturer=Nexperia, Supplier Part Number 1=1727-5201-1-ND, Manufacturer Part Number=PMEG3010ER,115, Pricing 1="1=0.36, 10=0.29, 100=0.1669, 500=0.1545, 1000=0.10506 (USD)", Stock 1=75070, Supplier 1=Digi-Key
D2: "DIODE SCHOTTKY 20V 1A TO236AB", Average Rectified Current=1A, Case/Package=TO-236AB, Forward Voltage=500mV, Manufacturer="NXP Semiconductors", Max Operating Temperature=150°C, Max Power Dissipation=420mW, Max Repetitive Reverse Voltage (Vrrm)=20V, Max Reverse Current=200uA, Max Surge Current=9A, Min Operating Temperature=-65°C, Package Quantity=1, Supplier Part Number 1=1727-3844-1-ND, ComponentLink1Description=http://www.nxp.com/documents/data_sheet/PMEG2010EH_EJ_ET.pdf?src-supplier=Digi-Key, ComponentLink1URL=http://www.nxp.com/documents/data_sheet/PMEG2010EH_EJ_ET.pdf?src-supplier=Digi-Key, ComponentLink2Description=http://www.nxp.com/documents/data_sheet/PMEG2010EH_EJ_ET.pdf?ecmp=mouser&src-supplier=Mouser, ComponentLink2URL=http://www.nxp.com/documents/data_sheet/PMEG2010EH_EJ_ET.pdf?ecmp=mouser&src-supplier=Mouser, ComponentLink3Description=http://www.nxp.com/documents/data_sheet/PMEG2010EH_EJ_ET.pdf?src-supplier=Avnet, ComponentLink3URL=http://www.nxp.com/documents/data_sheet/PMEG2010EH_EJ_ET.pdf?src-supplier=Avnet, ComponentLink4Description=http://www.nxp.com/documents/data_sheet/PMEG2010EH_EJ_ET.pdf?src-supplier=Avnet+Europe, ComponentLink4URL=http://www.nxp.com/documents/data_sheet/PMEG2010EH_EJ_ET.pdf?src-supplier=Avnet+Europe, Element Configuration=Single, Forward Current=1A, Lead Free="Lead Free", Manufacturer Part Number=PMEG2010ET,215, Max Reverse Leakage Current=200uA, Max Reverse Voltage (DC)=20V, Mount="Surface Mount", Number of Pins=3, Packaging="Tape and Reel", Peak Non-Repetitive Surge Current=9A, Pricing 1="1=0.46, 10=0.376, 100=0.2563, 500=0.1922, 1000=0.14414 (USD)", Radiation Hardening=No, RoHS Compliant=Yes, Series=-, Stock 1=13, Supplier 1=Digi-Key
DP1: "MOSFET P-CH 30V 4A SOT23F", Case/Package=SOT-23-3, Continuous Drain Current (ID)=4A, Drain to Source Breakdown Voltage=-30V, Drain to Source Resistance=136mR, Drain to Source Voltage (Vdss)=30V, Gate to Source Voltage (Vgs)=20V, Input Capacitance=280pF, Manufacturer=Toshiba, Max Operating Temperature=150°C, Max Power Dissipation=1W, Min Operating Temperature=-55°C, Package Quantity=1, Supplier Part Number 1=SSM3J334RLFCT-ND, Category=MOSFETs, ComponentLink1Description=https://datasheet.ciiva.com/6375/ssm3j334r-datasheet-en-20140301-6375723.pdf?src-supplier=Digi-Key, ComponentLink1URL=https://datasheet.ciiva.com/6375/ssm3j334r-datasheet-en-20140301-6375723.pdf?src-supplier=Digi-Key, ComponentLink2Description=https://datasheet.ciiva.com/6373/ssm3j334r-datasheet-en-20140301-6373837.pdf?src-supplier=Digi-Key, ComponentLink2URL=https://datasheet.ciiva.com/6373/ssm3j334r-datasheet-en-20140301-6373837.pdf?src-supplier=Digi-Key, Element Configuration=Single, Manufacturer Part Number=SSM3J334R,LF, Mount="Surface Mount", Number of Elements=1, Number of Pins=3, Packaging="Tape and Reel", Power Dissipation=1W, Pricing 1="1=0.47000, 10=0.33100, 25=0.30800, 100=0.16720, 500=0.13640, 1000=0.10120 (USD)", Rds On Max=71mR, RoHS=Yes, Stock 1=79343, Supplier 1=Digi-Key
J1: "CONN U.FL RCPT STR 50 OHM SMD", Case/Package=SMD/SMT, Manufacturer=Hirose, Package Quantity=10000, Supplier Part Number 1=U.FL-R-SMT-1(80)-CUTT, ComponentLink1Description=https://www.hirose.com/product/en/download_file/key_name/U.FL-R-SMT-1%2880%29/category/Specification%20Sheet/doc_file_id/37638/?file_category_id=9&item_id=03310472280&is_series=&src-supplier=Digi-Key, ComponentLink1URL=https://www.hirose.com/product/en/download_file/key_name/U.FL-R-SMT-1%2880%29/category/Specification%20Sheet/doc_file_id/37638/?file_category_id=9&item_id=03310472280&is_series=&src-supplier=Digi-Key, ComponentLink2Description=http://www.mouser.com/ds/2/185/U.FL_catalog-939761.pdf?src-supplier=Mouser, ComponentLink2URL=http://www.mouser.com/ds/2/185/U.FL_catalog-939761.pdf?src-supplier=Mouser, Lead Free="Lead Free", Manufacturer Part Number=U.FL-R-SMT-1(80), Packaging="Tape and Reel", Pricing 1="1=1.07, 500=0.785, 1500=0.74, 2500=0.72, 5000=0.695 (USD)", Stock 1=1272, Supplier 1="Future Electronics"
J2: "CONN FPC 20POS 0.5MM SMD R/A"
J3 J4 J7 J8: "CONN FPC 3POS 0.5MM SMD R/A", ComponentLink1Description=https://www.molex.com/pdm_docs/pk/5051479200-200.pdf?src-supplier=Digi-Key, ComponentLink1URL=https://www.molex.com/pdm_docs/pk/5051479200-200.pdf?src-supplier=Digi-Key, ComponentLink2Description=http://www.molex.com/pdm_docs/sd/5051470390_sd.pdf?src-supplier=Digi-Key, ComponentLink2URL=http://www.molex.com/pdm_docs/sd/5051470390_sd.pdf?src-supplier=Digi-Key, ComponentLink3Description=https://www.molex.com/pdm_docs/sd/5051470390_sd.pdf?src-supplier=Digi-Key, ComponentLink3URL=https://www.molex.com/pdm_docs/sd/5051470390_sd.pdf?src-supplier=Digi-Key
J5: "CABLE ADAPTER 6 POS", Manufacturer=Tag-Connect, Package Quantity=1, Supplier Part Number 1=TC2030-IDC-ND, ComponentLink1Description=http://www.tag-connect.com/Materials/TC2030-MCP%20Datasheet.pdf?src-supplier=Digi-Key, ComponentLink1URL=http://www.tag-connect.com/Materials/TC2030-MCP%20Datasheet.pdf?src-supplier=Digi-Key, Manufacturer Part Number=TC2030-IDC, Pricing 1="1=43.71 (USD)", Stock 1=284, Supplier 1=Digi-Key
J6: "Straight 4 pin magnetic data connector, stably working, high quality magnetic connectors", Manufacturer=HYTEPRO, Package=Custom, ComponentLink1Description="Supplier Link", ComponentLink1URL=https://www.hyte.pro/product/m411h.html, Manufacturer Part No=HTP-CON-M411H
L1: library part L-15W2N7SV4E, "FIXED IND 2.7NH 800MA 80MOHM SMD", Case/Package=0805, Case Code (Metric)=2012, Current Rating=800mA, DC Resistance (DCR)=80mR, Manufacturer=Johanson, Max Operating Temperature=125°C, Min Operating Temperature=-40°C, Package Quantity=2000, Resistor Type=Wirewound, Self Resonant Frequency=6GHz, Supplier Part Number 1=L-15W2N7SV4E-ND, Test Frequency=250MHz, Case Code (Imperial)=0805, ComponentLink1Description=http://www.mouser.com/ds/2/281/c51e-794816.pdf?src-supplier=Mouser, ComponentLink1URL=http://www.mouser.com/ds/2/281/c51e-794816.pdf?src-supplier=Mouser, ComponentLink2Description=http://search.murata.co.jp/Ceramy/image/img/PDF/ENG/L0075S0084LQP03TN_02.pdf?src-supplier=Future+Electronics, ComponentLink2URL=http://search.murata.co.jp/Ceramy/image/img/PDF/ENG/L0075S0084LQP03TN_02.pdf?src-supplier=Future+Electronics, ComponentLink3Description=http://www.mouser.com/ds/2/611/jti-cat-ww-ind-541413.pdf?src-supplier=Mouser, ComponentLink3URL=http://www.mouser.com/ds/2/611/jti-cat-ww-ind-541413.pdf?src-supplier=Mouser, ComponentLink4Description=http://components.arrow.com/part/dataview/43911991S9161110N2069?src-supplier=Arrow+Electronics, ComponentLink4URL=http://components.arrow.com/part/dataview/43911991S9161110N2069?src-supplier=Arrow+Electronics, ComponentLink5Description=https://www.johansontechnology.com/downloads/johanson-technology-rf-wirewound-chip-inductors.pdf?src-supplier=Digi-Key, ComponentLink5URL=https://www.johansontechnology.com/downloads/johanson-technology-rf-wirewound-chip-inductors.pdf?src-supplier=Digi-Key, Core Material=Ceramic, DC Current=800mA, Depth=1.45mm, Height=1.2mm, Height - Seated (Max)=0.055inch, Inductance=2.7nH, Length=0.079inch, Manufacturer Part Number=L-15W2N7SV4E, Max DC Current=800mA, Military Standard=Not, Mount="Surface Mount", Packaging="Tape and Reel", Pricing 1="4000=0.0813 (USD)", Q Factor=60, RoHS Compliant=Yes, Series=-, Shielding=Unshielded, Stock 1=0, Supplier 1=Digi-Key, Termination=SMD/SMT, Weight=0.000194oz, Width=0.049inch
L2: "10uH ±20% 1.6A 230mO SMD,4.75x4.2x2mm Inductors (SMD) RoHS", Manufacturer=COILMX, Package=Custom, Manufacturer Part No=MS0420-100M
L3: library part AMDLA4530Q-4R7MT, "FIXED IND 4.7UH 5A 52 MOHM SMD", Manufacturer=Abracon, Supplier Part Number 1=535-AMDLA4530Q-4R7MTCT-ND, Manufacturer Part Number=AMDLA4530Q-4R7MT, Pricing 1="1=1.08000, 10=1.00500, 25=0.92720, 50=0.77280, 100=0.72640, 250=0.64916, 500=0.55642 (USD)", Stock 1=963, Supplier 1=Digi-Key
L4: library part DFE201610E-1R0M=P2, "Inductor Power Shielded Wirewound 1uH 20% 1MHz Metal 2.7A 0.057Ohm DCR 0806 T/R", Manufacturer=Murata, Manufacturer Part Number=DFE201610E-1R0M=P2, Supplier Part Number 1=490-18106-1-ND, Category="Fixed Inductors", ComponentLink1Description=http://www.farnell.com/datasheets/2339713.pdf?src-supplier=Farnell, ComponentLink1URL=http://www.farnell.com/datasheets/2339713.pdf?src-supplier=Farnell, Pricing 1="1=0.37000, 10=0.32800, 25=0.28680, 50=0.24560, 100=0.22520, 250=0.20476, 500=0.19246, 1000=0.14742 (USD)", RoHS=Yes, RoHS Compliant=Yes, Stock 1=27, Supplier 1=Digi-Key
LED1 LED2: "Green 520~535nm 0402 Light Emitting Diodes (LED) RoHS", Illumination Color=Green, Manufacturer="Everlight Elec", Package=0402, Dominant Wavelength / Coordinate rank=520~535nm, Luminous Intensity (IF=20mA)=112~285mcd, Mounting Type="Surface Mount"
P2: library part "TEST POINT", "Test Point ON"
Q1: "TRANS 2NPN PREBIAS 0.15W UMT6", Case/Package=SOT-363, Collector Base Voltage (VCBO)=50V, Continuous Collector Current=100mA, Emitter Base Voltage (VEBO)=5V, Manufacturer=Rohm, Max Operating Temperature=150°C, Max Power Dissipation=150mW, Min Operating Temperature=-55°C, Package Quantity=1, Supplier Part Number 1=UMH3NTNCT-ND, Transition Frequency=250MHz, Collector Emitter Breakdown Voltage=50V, Collector Emitter Voltage (VCEO)=50V, ComponentLink1Description=http://www.farnell.com/datasheets/1645293.pdf?src-supplier=Element14, ComponentLink1URL=http://www.farnell.com/datasheets/1645293.pdf?src-supplier=Element14, ComponentLink2Description=http://rohmfs.rohm.com/en/products/databook/datasheet/discrete/transistor/digital/emh3t2r-e.pdf?src-supplier=Digi-Key, ComponentLink2URL=http://rohmfs.rohm.com/en/products/databook/datasheet/discrete/transistor/digital/emh3t2r-e.pdf?src-supplier=Digi-Key, ComponentLink3Description=http://rohmfs.rohm.com/en/techdata_basic/transistor/taping/UMT6_TN_taping.pdf?src-supplier=Digi-Key, ComponentLink3URL=http://rohmfs.rohm.com/en/techdata_basic/transistor/taping/UMT6_TN_taping.pdf?src-supplier=Digi-Key, ComponentLink4Description=http://www.produktinfo.conrad.com/datenblaetter/125000-149999/140593-da-01-en-TRANSISTOR_UMH3_NTN_SOT_363.pdf?src-supplier=Conrad, ComponentLink4URL=http://www.produktinfo.conrad.com/datenblaetter/125000-149999/140593-da-01-en-TRANSISTOR_UMH3_NTN_SOT_363.pdf?src-supplier=Conrad, Current Rating=100mA, Element Configuration=Dual, hFE Min=100, Lead Free="Lead Free", Manufacturer Part Number=UMH3NTN, Max Breakdown Voltage=50V, Max Collector Current=100mA, Max Output Current=100mA, Mount="Surface Mount", Number of Pins=6, Operating Supply Voltage=50V, Packaging="Tape and Reel", Polarity=NPN, Power Dissipation=150mW, Pricing 1="1=0.39, 10=0.293, 25=0.264, 100=0.1392, 500=0.12336, 1000=0.096 (USD)", Radiation Hardening=No, REACH SVHC="No SVHC", Stock 1=12797, Supplier 1=Digi-Key, Voltage Rating (DC)=50V
QP1: "TRANS NPN 40V 0.2A SOT23", Case/Package=SOT-23, Collector Base Voltage (VCBO)=60V, Collector Emitter Breakdown Voltage=40V, Collector Emitter Saturation Voltage=300mV, Current Rating=100mA, Emitter Base Voltage (VEBO)=6V, Frequency=300MHz, Manufacturer=MCC, Max Collector Current=200mA, Max Operating Temperature=150°C, Max Power Dissipation=350mW, Min Operating Temperature=-55°C, Package Quantity=1, Supplier Part Number 1=MMBT3904TPMSCT-ND, Category=BJTs, Collector Emitter Voltage (VCEO)=40V, Collector-emitter Voltage-Max=300mV, ComponentLink1Description=https://datasheet.ciiva.com/16291/mmbt3904sot-23-37005-16291911.pdf?src-supplier=Mouser, ComponentLink1URL=https://datasheet.ciiva.com/16291/mmbt3904sot-23-37005-16291911.pdf?src-supplier=Mouser, ComponentLink2Description=https://datasheet.ciiva.com/15139/getdatasheetpartid-251950-15139820.pdf?src-supplier=Verical, ComponentLink2URL=https://datasheet.ciiva.com/15139/getdatasheetpartid-251950-15139820.pdf?src-supplier=Verical, ComponentLink3Description=https://datasheet.ciiva.com/972/mmbt3904sot-23-972515.pdf?src-supplier=Digi-Key, ComponentLink3URL=https://datasheet.ciiva.com/972/mmbt3904sot-23-972515.pdf?src-supplier=Digi-Key, ComponentLink4Description=https://datasheet.ciiva.com/16742/mmbt3904tsot-523-16742101.pdf?src-supplier=Future+Electronics, ComponentLink4URL=https://datasheet.ciiva.com/16742/mmbt3904tsot-523-16742101.pdf?src-supplier=Future+Electronics, ComponentLink5Description=https://datasheet.ciiva.com/972/mmbt3904sot-23-972516.pdf?src-supplier=Digi-Key, ComponentLink5URL=https://datasheet.ciiva.com/972/mmbt3904sot-23-972516.pdf?src-supplier=Digi-Key, ComponentLink6Description=https://datasheet.ciiva.com/14546/70055699-14546053.pdf?src-supplier=Allied+Electronics, ComponentLink6URL=https://datasheet.ciiva.com/14546/70055699-14546053.pdf?src-supplier=Allied+Electronics, Element Configuration=Single, Gain Bandwidth Product=300MHz, Height=1.12mm, hFE Min=40, Lead Free="Lead Free", Length=3.04mm, Manufacturer Part Number=MMBT3904-TP, Max Breakdown Voltage=40V, Max Frequency=300MHz, Mount="Surface Mount", Number of Elements=1, Number of Pins=3, Packaging="Tape and Reel", Polarity=NPN, Power Dissipation=350mW, Pricing 1="1=0.10000, 10=0.06300, 25=0.06000, 100=0.03380, 500=0.02656, 1000=0.01844 (USD)", Radiation Hardening=No, RoHS=Yes, RoHS Compliant=Yes, Series=-, Stock 1=659192, Supplier 1=Digi-Key, Transition Frequency=300MHz, Voltage Rating (DC)=40V, Width=1.4mm
R1 R3 R4 R5 R6: library part CR0201F10K0Q15Z, "10kO ±1% 1/20W ±200ppm/? 0201 Chip Resistor - Surface Mount RoHS", Manufacturer="Ever Ohms Tech", Package=0201, Power(Watts)=1/20W, Resistance=10kO, Temperature Coefficient=±200ppm/?, Tolerance=±1%
R2: library part AC0201JR-071K2L, "Chip Resistor Automotive Grade Thick Film 0201 1.2kOhm 5% Paper T/R", Case/Package=0201, Manufacturer=Yageo, Max Operating Temperature=155°C, Max Power Dissipation=50mW, Min Operating Temperature=-55°C, Resistance=1.2kR, Resistor Type="Thick Film", Temperature Coefficient=200ppm/°C, Tolerance=5%, Category="Chip SMD Resistors", ComponentLink1Description=http://www.yageo.com/NewPortal/yageodocoutput?fileName=/pdf/R-Chip/PYu-AC_51_RoHS_L_6.pdf&src-supplier=Digi-Key, ComponentLink1URL=http://www.yageo.com/NewPortal/yageodocoutput?fileName=/pdf/R-Chip/PYu-AC_51_RoHS_L_6.pdf&src-supplier=Digi-Key, Features="Moisture Resistant,Automotive AEC-Q200", Height=0.01inch, Length=0.024inch, Manufacturer Part Number=AC0201JR-071K2L, Number of Terminations=2, Packaging="Tape and Reel", Pricing 1="10000=0.00143, 20000=0.00141, 40000=0.00137, 60000=0.00134, 80000=0.00129, 100000=0.00126, 1000000=0.00123 (USD)", RoHS=Yes, RoHS Compliant=Yes, Supplier 1=Avnet, Supplier Part Number 1=AC0201JR-071K2L, Width=0.012inch
R7 RF1: library part RC0201FR-0747KL, "GENERAL 0201 11% REEL (7INCH)", Case Code (Imperial)=0201, Case Code (Metric)=0603, Manufacturer=Yageo, Max Operating Temperature=125°C, Max Power Dissipation=50mW, Min Operating Temperature=-55°C, Package Quantity=1, Resistance=47kR, Resistor Type="Thick Film", Supplier Part Number 1=311-47KMCT-ND, Temperature Coefficient=200ppm/°C, Tolerance=1%, Voltage Rating=25V, Case/Package=0201, Category="Chip SMD Resistors", ComponentLink1Description=https://datasheet.ciiva.com/28399/pyu-rc0201-51-rohs-l-8-28399335.pdf?src-supplier=Avnet+Europe, ComponentLink1URL=https://datasheet.ciiva.com/28399/pyu-rc0201-51-rohs-l-8-28399335.pdf?src-supplier=Avnet+Europe, ComponentLink2Description=https://datasheet.ciiva.com/29710/pyu-r-int-thick-7-29710919.pdf?src-supplier=Digi-Key, ComponentLink2URL=https://datasheet.ciiva.com/29710/pyu-r-int-thick-7-29710919.pdf?src-supplier=Digi-Key, ComponentLink3Description=https://datasheet.ciiva.com/7672/1563626-7672232.pdf?src-supplier=Element14, ComponentLink3URL=https://datasheet.ciiva.com/7672/1563626-7672232.pdf?src-supplier=Element14, ComponentLink4Description=https://datasheet.ciiva.com/29710/pyu-r-int-thick-7-29710920.pdf?src-supplier=Digi-Key, ComponentLink4URL=https://datasheet.ciiva.com/29710/pyu-r-int-thick-7-29710920.pdf?src-supplier=Digi-Key, ComponentLink5Description=https://datasheet.ciiva.com/8889/pyu-rc0201-51-rohs-l-8-8889065.pdf?src-supplier=Avnet, ComponentLink5URL=https://datasheet.ciiva.com/8889/pyu-rc0201-51-rohs-l-8-8889065.pdf?src-supplier=Avnet, ComponentLink6Description=https://datasheet.ciiva.com/26829/getdatasheetpartid-422496-26829867.pdf?src-supplier=Verical, ComponentLink6URL=https://datasheet.ciiva.com/26829/getdatasheetpartid-422496-26829867.pdf?src-supplier=Verical, ComponentLink7Description=https://datasheet.ciiva.com/16855/pyu-rc0201-51-rohs-l-8-16855917.pdf?src-supplier=Avnet+Europe, ComponentLink7URL=https://datasheet.ciiva.com/16855/pyu-rc0201-51-rohs-l-8-16855917.pdf?src-supplier=Avnet+Europe, ComponentLink8Description=https://datasheet.ciiva.com/25647/pyu-r-int-thick-7-25647310.pdf?src-supplier=Digi-Key, ComponentLink8URL=https://datasheet.ciiva.com/25647/pyu-r-int-thick-7-25647310.pdf?src-supplier=Digi-Key, Contact Plating=Tin,Matte, Depth=0.3mm, Features="Moisture Resistant", Height=0.01inch, Lead Free="Lead Free", Length=0.6mm, Manufacturer Part Number=RC0201FR-0747KL, Military Standard=Not, Number of Terminations=2, Packaging="Tape and Reel", Power Rating=50mW, Pricing 1="1=0.10000, 10=0.04200, 100=0.01700, 1000=0.00765, 2500=0.00664, 5000=0.00548 (USD)", Radiation Hardening=No, REACH SVHC=Unknown, RoHS=Yes, Stock 1=407876, Supplier 1=Digi-Key, Termination=SMD/SMT, Weight=6E-06oz, Width=0.012inch
R8: library part 0201WMF1404TEE, "1.4MO ±1% 1/20W ±200ppm/? 0201 Chip Resistor - Surface Mount RoHS", Manufacturer="UNI-ROYAL(Uniroyal Elec)", Package=0201, Power(Watts)=1/20W, Resistance=1.4MO, Temperature Coefficient=±200ppm/?, Tolerance=±1%